# EAGLE board sweef_platine_v5_fertig (EAGLE 9.7.0)
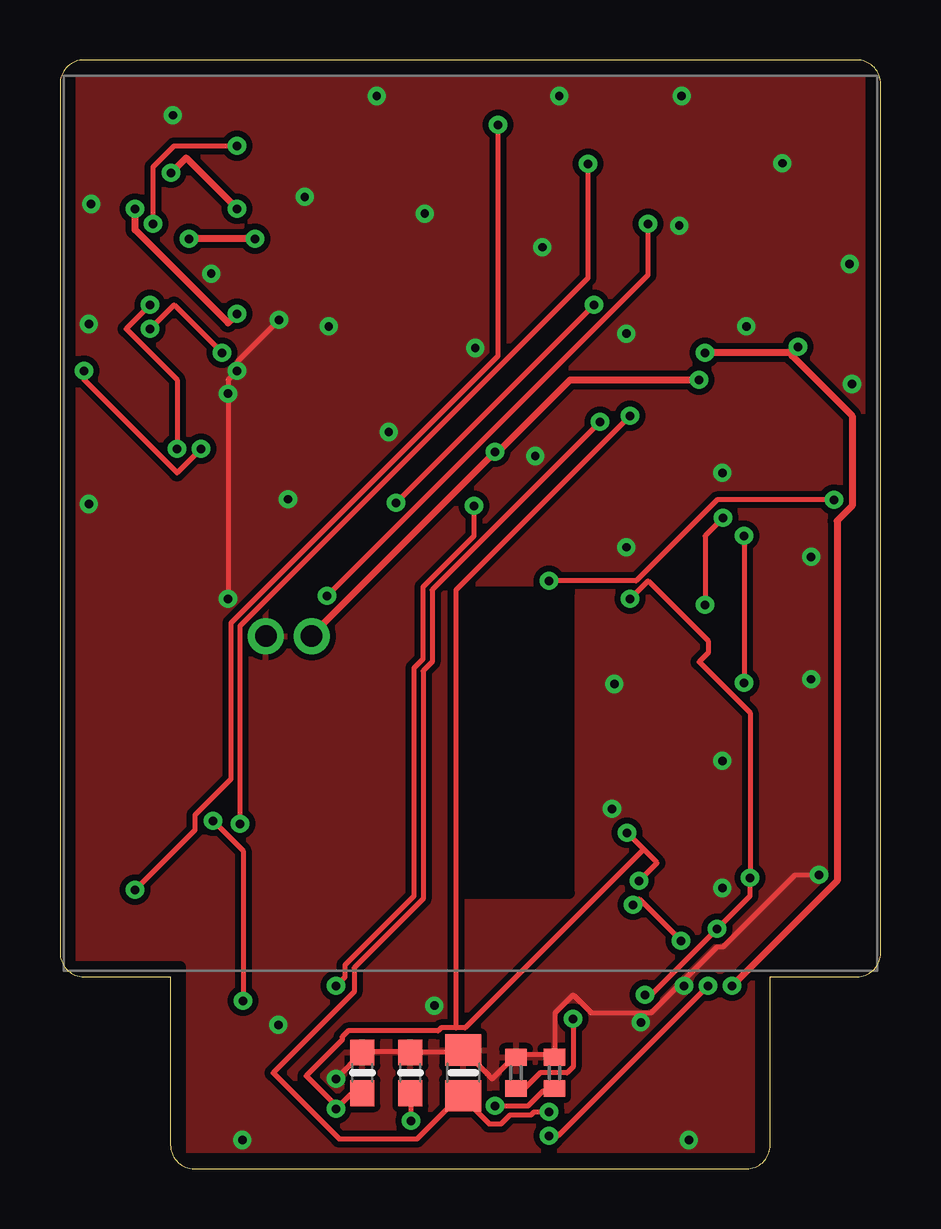
[diagram p0: board, top side]
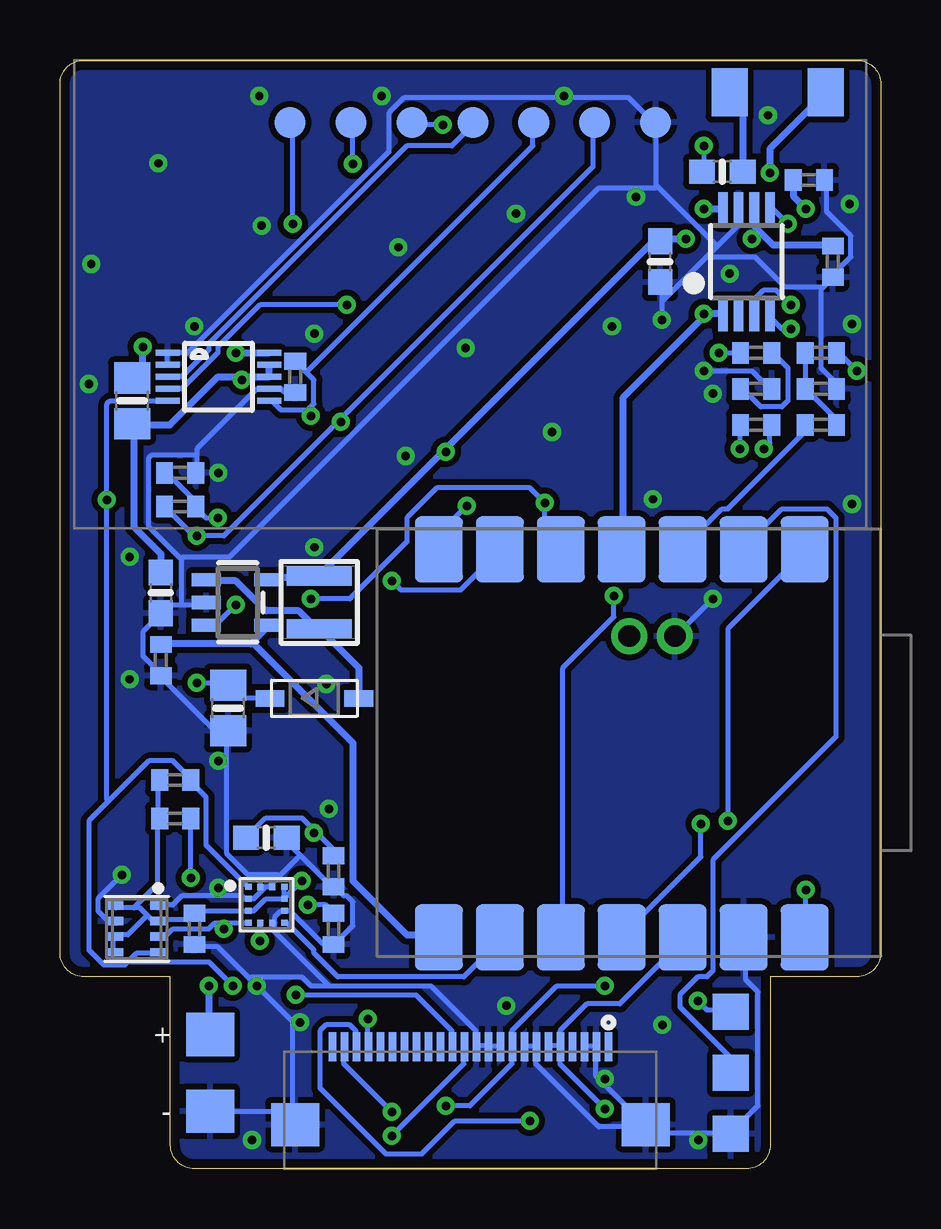
[diagram p1: board, bottom side, seen from below]

Size 34.2 x 46.2 mm. Coordinates in mm from the lower left corner, seen from the top.
Outline: 5.6,0 28.6,0 arc90 29.6,1 29.6,8 33.2,8 arc90 34.2,9 34.2,45.2 arc90 33.2,46.2 1,46.2 arc90 0,45.2 0,9 arc90 1,8 4.6,8 4.6,1 arc90 5.6,0
Copper layers (1*16): Top 0.035mm / dielectric 1.5mm / Bottom 0.035mm
Design rules "Fusion Electronics Design Rules": minimum track width 6mil, minimum drill 0.35mm, track to track 6mil, track to pad 6mil, pad to pad 6mil, via to via 6mil, smd to smd 6mil, copper to edge 0.4mm, drill to drill 6mil, minimum pad ring 10mil, minimum via ring 8mil, stop-mask expansion 4mil, vias tented up to drill 9999mil, thermal gap 10mil
Net classes: 0 default: width 0.2 mm, drill 0.3 mm, clearance 0.15 mm; 1 Strom: width 0.3 mm, drill 0.3 mm, clearance 0.15 mm to class 0, clearance 0.15 mm
tRestrict: area 16.6,11.5 to 21.2,24; area -1,-1 to 5,8.4; area 29.2,-1 to 35.2,8.4; area -3,-3 to 0.4,49.2; area 33.8,-3 to 37.2,49.2; area -3,45.8 to 37.2,49.2; area -3,-3 to 37.2,0.4
vRestrict: area 16.6,11.5 to 21.2,24; area -1,-1 to 5,8.4; area 29.2,-1 to 35.2,8.4; area -3,-3 to 0.4,49.2; area 33.8,-3 to 37.2,49.2; area -3,45.8 to 37.2,49.2; area -3,-3 to 37.2,0.4

## Footprints (pad centres in the part's own frame; a part is rotated, then mirrored left to right if it is on the bottom)
C0402 = smd 0.7 x 0.9: 1 -0.65,0; 2 0.65,0
0603-NO = smd 1.075 x 1: 1 -0.85,0; 2 0.85,0
0805-NO = smd 1.3 x 1.5: 1 -0.95,0; 2 0.95,0
SOD-123 = smd 1.2 x 0.7: A 1.85,0; C -1.85,0
PADS_2_AKKU = smd 2 x 1.8: 1 0,1.6; 2 0,-1.6
FPC-24_XUNPU_FPC-05FB-24PH20 = smd 0.3 x 1.2: 1 -5.75,-1.84; 2 -5.25,-1.84; 3 -4.75,-1.84; 4 -4.25,-1.84; 5 -3.75,-1.84; 6 -3.25,-1.84; 7 -2.75,-1.84; 8 -2.25,-1.84; 9 -1.75,-1.84; 10 -1.25,-1.84; 11 -0.75,-1.84; 12 -0.25,-1.84; 13 0.25,-1.84; 14 0.75,-1.84; 15 1.25,-1.84; 16 1.75,-1.84; 17 2.25,-1.84; 18 2.75,-1.84; 19 3.25,-1.84; 20 3.75,-1.84; 21 4.25,-1.84; 22 4.75,-1.84; 23 5.25,-1.84; 24 5.75,-1.84 | smd 2 x 1.8: MNT1@0 -7.3,1.41; MNT2@0 7.3,1.41
PADS_3_TASTER = smd 1.5 x 1.5: 1 -2.54,0; 2 0,0; 3 2.54,0
PADS_2_LS = smd 1.5 x 2: 1 -2,0; 2 2,0
INDUCTOR_3X3 = smd 2.7 x 0.8: P$1 0,1.1; P$2 0,-1.1
R0402 = smd 0.7 x 0.9: 1 -0.65,0; 2 0.65,0
TP_7 = smd 1.3 x 1.3: 1 -7.62,0; 2 -5.08,0; 3 -2.54,0; 4 0,0; 5 2.54,0; 6 5.08,0; 7 7.62,0
XIAO_NRF52840_SMD = smd 2.75 x 2: 1 -8.055,7.325; 2 -8.055,4.785; 3 -8.055,2.245; 4 -8.055,-0.295; 5 -8.055,-2.835; 6 -8.055,-5.375; 7 -8.055,-7.915; 8 8.11,-7.915; 9 8.11,-5.375; 10 8.11,-2.835; 11 8.11,-0.295; 12 8.11,2.245; 13 8.11,4.785; 14 8.11,7.325 | drill 0.9 pad 1.5: 19 -4.445,0.018; 20 -4.445,1.923
BMX280_COMBO = smd 0.725 x 0.35: 1 0.925,0.975; 2 0.925,0.325; 3 0.925,-0.325; 4 0.925,-0.975; 5 -0.925,-0.975; 6 -0.925,-0.325; 7 -0.925,0.325; 8 -0.925,0.975
MSOP8_0.65MM = smd 0.4 x 1.4: 1 -0.975,-2.2; 2 -0.325,-2.2; 3 0.325,-2.2; 4 0.975,-2.2; 5 0.975,2.2; 6 0.325,2.2; 7 -0.325,2.2; 8 -0.975,2.2
LGA12_2X2MM = smd 0.275 x 0.25: 1 -0.75,0.75; 2 -0.75,0.25; 3 -0.75,-0.25; 4 -0.75,-0.75; 7 0.75,-0.75; 8 0.75,-0.25; 9 0.75,0.25; 10 0.75,0.75 | smd 0.25 x 0.275: 5 -0.25,-0.75; 6 0.25,-0.75; 11 0.25,0.75; 12 -0.25,0.75
MSOP10 = smd 0.25 x 1: 1 -1,-2.113; 2 -0.5,-2.113; 3 0,-2.113; 4 0.5,-2.113; 5 1,-2.113; 6 1,2.113; 7 0.5,2.113; 8 0,2.113; 9 -0.5,2.113; 10 -1,2.113
SOT23-5 = smd 0.55 x 1.2: 1 -0.95,-1.3; 2 0,-1.3; 3 0.95,-1.3; 4 0.95,1.3; 5 -0.95,1.3

## Placement (x,y rotation side)
C10  100 nF  [C0402]  24.4,33 270 bottom
C20  4,7 uF  [0603-NO]  12.6,4 90 top
C21  4,7 uF  [0603-NO]  14.6,4 90 top
C22  4,7 uF 25 V  [0805-NO]  16.8,4 90 top
C23  4,7 uF  [0603-NO]  30,24 270 bottom
C24  4,7 uF 25 V  [0805-NO]  27.2,19.2 270 bottom
C30  100 nF  [C0402]  28.6,10 270 bottom
C31  220 nF  [C0402]  22.8,10 270 bottom
C32  100 nF  [C0402]  22.8,12.4 270 bottom
C33  10 uF  [0603-NO]  25.6,13.8 0 bottom
C40  33 nF  [C0402]  2.5,32.5 0 bottom
C41  1 uF  [C0402]  2.5,34 0 bottom
C42  1 uF  [C0402]  5.2,34 0 bottom
C43  1 uF  [C0402]  2,37.8 270 bottom
C44  10 uF  [0603-NO]  9.2,37.8 270 bottom
D1  B5819W  [SOD-123]  23.6,19.6 0 bottom
J1  Akku  [PADS_2_AKKU]  27.95,4 0 bottom
J2  Display-Stecker  [FPC-24_XUNPU_FPC-05FB-24PH20]  17.1,3.25 180 bottom
J3  Taster extern  [PADS_3_TASTER]  6.25,4 270 bottom
J5  Lautsprecher/Piezo  [PADS_2_LS]  4.3,44.85 0 bottom
L1  10 uH  [INDUCTOR_3X3]  23.4,23.6 0 bottom
R1  2,2 kR  [R0402]  29.4,14.6 0 bottom
R2  2,2 kR  [R0402]  29.4,16.2 0 bottom
R10  0,1 R 1 %  [0805-NO]  31.2,32 270 bottom
R20  910 kR  [R0402]  19,4 90 top
R21  100 kR  [R0402]  20.6,4 90 top
R22  1 MR  [R0402]  29.2,27.6 0 bottom
R23  105 kR  [R0402]  29.2,29 0 bottom
R24  100 kR  [R0402]  30,21.2 270 bottom
R30  1 kR  [R0402]  2.5,31 0 bottom
R31  10 kR  [R0402]  5.2,31 0 bottom
R32  10 kR  [R0402]  5.2,32.5 0 bottom
R33  100 kR  [R0402]  3,41.2 0 bottom
R34  0 R  [0603-NO]  6.6,41.55 0 bottom
TP  Testpunkte  [TP_7]  17,43.6 0 bottom
U1  XIAO nRF52840 Sense  [XIAO_NRF52840_SMD]  10.5,17.75 270 bottom
U2  DPS310  [BMX280_COMBO]  31,10 0 bottom
U3  PAM8302A  [MSOP8_0.65MM]  5.6,37.8 0 bottom
U4  LIS2MDL  [LGA12_2X2MM]  25.6,11 0 bottom
U5  INA226  [MSOP10]  27.6,33 270 bottom
U6  TPS61040  [SOT23-5]  26.8,23.6 270 bottom

## Library data of the parts
C10 C20-C24 C30-C33 C40-C44 D1 J1-J3 J5 L1 R1 R2 R10 R20-R24 R30-R34 TP U1-U6 = sweef

## Nets
+3V3: C10.1 C20.1 C30.1 C32.1 C33.1 J2.5 J2.6 R1.1 R2.1 TP.5 U1.12 U2.2 U2.5 U2.6 U2.8 U4.3 U4.9 U4.10 U5.6
AMP_INM: C42.1 U3.4
AMP_INM_R: C42.2 R32.1
AMP_INP: R31.2 U3.3
AMP_OUTP: R34.1 U3.5
BOOST_EIN [Strom]: R24.1 U1.8 U6.4
BOOST_FB: R22.2 R23.1 U6.3
BOOST_SW [Strom]: D1.A L1.P$2 U6.1
GND: C10.2 C20.2 C21.2 C22.2 C23.2 C24.2 C30.2 C31.2 C32.2 C33.2 C40.2 C43.2 C44.2 J1.2 J2.2 J2.3 J2.7 J2.8 J2.10 J2.11 J2.12 J2.MNT1@0 J2.MNT2@0 J3.3 R20.2 R21.2 R23.2 R24.2 R32.2 R33.2 TP.7 U1.13 U1.20 U2.1 U2.7 U3.7 U4.2 U4.6 U4.8 U4.11 U4.12 U5.1 U5.2 U5.7 U6.2
KOMPASS_C1: C31.1 U4.5
KOMPASS_INT: U1.9 U4.7
LS+ [Strom]: J5.1 R34.2
LS- [Strom]: J5.2 U3.8
OLED_IREF: J2.21 R20.1
OLED_RES: J2.9 R21.1 U1.7
OLED_VCOMH: C21.1 J2.22
SCL: J2.13 R2.2 U1.6 U2.4 U4.1 U5.5
SDA: J2.14 R1.2 U1.5 U2.3 U4.4 U5.4
TASTE1: J3.1 U1.1
TASTE2: J3.2 U1.2
TON: R30.1 U1.3
TON_HP: C41.2 R31.1
TON_TP: C40.1 C41.1 R30.2
TP_5V: TP.3 U1.14
TP_ALERT: TP.4 U5.3
TP_D9: TP.1 U1.10
TP_D10: TP.2 U1.11
VBAT_AKKU [Strom]: J1.1 R10.1 U5.10
VBAT_SYS [Strom]: C23.1 C43.1 C44.1 L1.P$1 R10.2 U1.19 U3.6 U5.8 U5.9 U6.5
VERST_EIN [Strom]: R33.1 U1.4 U3.1
VPP_13V: C22.1 C24.1 D1.C J2.23 R22.1 TP.6

## Tracks (layer width: path | path; a pad name or v marks a point on that pad's centre or on a via)
+3V3  (via drill 0.35)
  Top 0.2: C20.1 12.5,3.12 12.12,3.12 v11.5,2.5 11.5,2.62 10.25,3.88 11.75,5.38 11.75,5.5 12,5.75 15.75,5.75 15.88,5.88 16.5,5.88 | 24.31,13.31 24.88,12.75 v24.12,12 | 24.31,13.31 v23.62,14 | 16.5,5.88 16.88,5.88 24.31,13.31 | v23.75,31.38 16.5,24.12 16.5,5.88
  Bottom 0.2: 23.94,33.19 23.62,32.88 23.62,31.88 23.81,31.69 | 23.94,33.19 C10.1 | 23.81,31.69 23.88,31.62 25,31.62 25.38,32 U5.6 | 23.94,33.19 14.5,42.62 14.5,43.5 TP.5 | v11.5,2.5 13.38,4.38 13.38,5 J2.5 13.38,5.12 | 13.38,5.12 13.75,5.12 J2.6 | 13.38,5.12 13.38,5.75 12.25,6.88 10.88,6.88 8.38,9.38 8.38,9.62 U1.12 | 23.56,14.06 24.12,14.62 25.62,14.62 C33.1 | 23.56,14.06 22.88,13.38 22.88,13.12 C32.1 | R2.1 30.12,16.12 30.12,14.62 R1.1 30.12,14.5 30.12,11.88 31.12,10.88 | U2.5 32,9.12 32,9.62 U2.6 31.88,9.75 31.38,9.75 30.56,10.56 | 24.88,11.25 24.88,11.75 U4.10 | 24.88,11.25 25.62,11.25 26.12,10.75 U4.3 28.5,10.75 C30.1 28.88,10.38 30,10.38 U2.2 30.12,10.38 30.38,10.38 30.56,10.56 | 31.12,10.88 30.88,10.88 30.56,10.56 | 31.12,10.88 31.88,10.88 U2.8 | 24.88,11.25 v24.12,12 | v23.62,14 23.56,14.06 | 24.88,11.25 U4.9 | v23.75,31.38 23.75,31.62 23.81,31.69
AMP_INM  (via drill 0.35)
  Top 0.2: v6.75,34 4.75,36 v3.75,35
  Bottom 0.2: v6.75,34 C42.1 | v3.75,35 4.12,35 4.62,35.5 U3.4
AMP_INM_R
  Bottom 0.2: R32.1 5.75,32.5 5,31.75 4.12,31.75 3.88,32 3.88,33.38 4.5,34 C42.2
AMP_INP  (via drill 0.35)
  Top 0.2: v4.88,30 4.88,32.88 2.75,35 v3.75,36
  Bottom 0.2: v4.88,30 4.62,30.25 4.62,31 R31.2 | v3.75,36 4.38,36.62 4.88,36.62 5.25,36.25 5.25,35.62 U3.3
AMP_OUTP  (via drill 0.35)
  Top 0.2: v7.38,42.62 4.75,42.62 3.88,41.75 v3.88,39.38
  Bottom 0.2: v7.38,42.62 7.38,41.62 R34.1 | v3.88,39.38 4.5,40 U3.5
BOOST_EIN
  Bottom 0.3: 26.25,21.88 30,21.88 R24.1 | 26.25,21.88 25.5,22.62 U6.4 | U1.8 18.5,9.75 19.75,9.75 22,12 22,17.75 26.12,21.88 26.25,21.88
BOOST_FB  (via drill 0.35)
  Top 0.2: v26.88,23.5 26.88,26.38 v27.62,27.12
  Bottom 0.2: R23.1 29.75,29 28.62,27.88 28.62,27.62 R22.2 28.5,27.5 28.12,27.12 v27.62,27.12 | v26.88,23.5 27.62,22.75 28,22.75 U6.3
BOOST_SW
  Bottom 0.3: D1.A 21.75,20.88 23.38,22.5 L1.P$2 23.5,22.5 24.25,23.25 25.62,23.25 26.88,24.5 28,24.5 U6.1
GND  (via drill 0.35)
  Top 0.2: v9.12,35.38 7.38,33.62 v7.38,33.25 7,32.88 v7,23.75 | v31.62,12.25 30.62,12.25 27.62,9.25 27.38,9.25 25.94,7.81 | 25.94,7.81 24.62,6.5 22.12,6.5 21.38,7.25 20.62,6.5 20.62,4.75 R21.2 20.5,4.75 19,4.75 | 19,4.75 18,3.75 C22.2 16.75,4.88 14.62,4.88 C21.2 14.5,4.88 12.62,4.88 C20.2 v11.5,3.75 | 19,4.75 R20.2 | v26,7.62 26,7.75 25.94,7.81
  Bottom 0.2: 2.44,36.69 2,37.12 C43.2 2,37.25 1.25,38 1.25,38.88 2.25,39.88 2.25,41.12 R33.2 | 2.44,36.69 2.5,36.62 2.5,33.38 1.88,32.75 1.88,32.5 C40.2 | v7.38,33.25 5.38,33.25 4.62,32.5 R32.2 | 9.12,36.12 9.12,36.88 C44.2 | 9.12,36.12 v9.12,35.38 | 9.12,36.12 7.19,38.06 | 7.19,38.06 6.81,38.44 | 6.81,38.44 6,39.25 6,40 U3.7 | v7,23.75 8.5,22.25 U1.20 | 2.44,36.69 2.5,36.75 4,36.75 5.25,38 7.12,38 7.19,38.06 | U5.2 29.75,33.5 29.75,34 U5.1 28.88,34 20.5,42.38 20.5,44 19.88,44.62 10.5,44.62 9.5,43.62 TP.7 9.38,43.5 9.38,41 9.31,40.94 | 9.31,40.94 6.81,38.44 | J2.8 14.75,5.12 14.38,5.12 J2.7 14.38,5 14.38,4.38 11.75,1.75 9.88,1.75 J2.MNT1@0 | J2.3 12.25,5.12 11.88,5.12 J2.2 11.88,5 11.88,3.88 11.56,3.56 | 11.56,3.56 9.88,1.88 J2.MNT1@0 | 6.25,1.5 9.5,1.5 9.75,1.75 J2.MNT1@0 | 6.25,1.5 5.12,2.62 5.12,7.38 5.62,7.88 5.62,9.62 U1.13 | 6.25,1.5 J3.3 | v31.62,12.25 32.62,11.25 32.62,10.75 32.25,10.38 32,10.38 U2.7 | v11.5,3.75 11.5,3.62 11.56,3.56 | C10.2 24.5,32.38 24.88,32.38 25,32.5 U5.7 26,32.5 28.5,30 28.5,29.75 | 28.5,29.75 28.5,29 R23.2 | 29.12,23.5 29.75,23.5 30,23.25 C23.2 30,23.12 30.75,22.38 30.75,21.38 30,20.62 R24.2 30,20.5 27.75,18.25 27.25,18.25 | 29.12,23.5 28.12,23.5 U6.2 | 28.5,29.75 30.38,29.75 30.5,29.62 30.5,26.75 29.19,25.44 | 29.19,25.44 29.12,25.38 29.12,23.5 | 24.19,13.06 24.75,13.62 C33.2 | 24.19,13.06 22.88,11.75 C32.2 22.75,11.75 22.38,11.38 22.25,11.38 22,11.12 22,10.12 22.75,9.38 C31.2 22.88,9.38 23.25,9.38 24.62,10.75 U4.8 25,10.75 25.25,10.5 25.25,10.25 | U4.12 25.62,11.75 | 25.62,11.75 25.5,11.75 | 25.5,11.75 U4.11 | 25.62,11.75 26.12,11.25 U4.2 26.5,11.25 26.62,11.38 29.12,11.38 29.5,11 30,11 U2.1
  Bottom 0.2: 25.5,11.75 25.06,12.19 | 25.06,12.19 24.19,13.06 | J2.10 15.88,5.12 16.25,5.12 J2.11 16.38,5.12 16.75,5.12 J2.12 16.88,5.12 16.88,5.75 18.75,7.62 23,7.62 | 26.31,7.94 v26,7.62 24.5,6.12 24.5,2.38 | 26.31,7.94 27.62,9.25 28.5,9.25 C30.2 | 24.5,2.38 24.5,1.88 J2.MNT2@0 24.5,2.38 | 23,7.62 23.75,7.62 24.12,8 26.25,8 26.31,7.94 | 25.25,10.25 25.25,9.88 23,7.62 | 25.25,10.25 U4.6 | 24.5,2.38 27.88,2.38 J1.2 | 27.25,18.25 27.25,13.12 26.38,12.25 25.12,12.25 25.06,12.19 | 27.25,18.25 C24.2 | 9.31,40.94 9.38,40.88 11.75,40.88 27.12,25.5 29.12,25.5 29.19,25.44
  other vias: 7.6,1.2 26.2,1.2 9.1,6 24.2,6.1 15.6,6.8 27.6,11.7 23,15 27.6,17 23.1,20.2 31.3,20.4 31.3,25.5 23.6,25.9 1.2,27.7 9.5,27.9 27.6,29 19.8,29.7 13.7,30.7 7,32.3 33,32.7 17.3,34.2 23.6,34.8 11.2,35.1 28.6,35.1 1.2,35.2 6.3,37.3 32.9,37.7 20.1,38.4 25.8,39.3 15.2,39.8 1.3,40.2 10.2,40.5 30.1,41.9 4.7,43.9 13.2,44.7 20.8,44.7 25.9,44.7
  pour Top (isolate 0.25): 5,0.4 29.2,0.4 29.2,8.4 33.8,8.4 33.8,45.8 0.4,45.8 0.4,8.4 5,8.4
  pour Bottom (isolate 0.25): 5,0.4 29.2,0.4 29.2,8.4 33.8,8.4 33.8,45.8 0.4,45.8 0.4,8.4 5,8.4
KOMPASS_C1  (via drill 0.35)
  Top 0.2: v25.88,9.5 24.12,11.25 v23.88,11
  Bottom 0.2: v25.88,9.5 25.88,10.25 U4.5 | v23.88,11 23.12,11 22.88,10.75 C31.1
KOMPASS_INT
  Bottom 0.2: U1.9 15.88,9.5 17.38,8 22.62,8 23.62,9 23.62,9.12 24.75,10.25 U4.7
LS+
  Bottom 0.3: R34.2 5.75,44.25 6.25,44.75 J5.1
LS-  (via drill 0.35)
  Top 0.3: v7.38,40 5.25,42.12 v4.62,41.5
  Bottom 0.3: v7.38,40 U3.8 | v4.62,41.5 4.62,42.5 2.38,44.75 J5.2
OLED_IREF  (via drill 0.35)
  Top 0.2: v21.38,6.25 21.38,4.25 21.12,4 20,4 19.38,3.38 19,3.38 R20.1
  Bottom 0.2: v21.38,6.25 21.38,5.12 J2.21
OLED_RES  (via drill 0.35)
  Top 0.2: v18.12,2.62 19.5,2.62 20.12,3.25 20.5,3.25 R21.1 | v17.25,27.62 17.25,26.38 15.12,24.25 15.12,21.25 14.75,20.88 14.75,11.38 11.88,8.5 11.88,8 v11.5,7.62
  Bottom 0.2: v18.12,2.62 17.12,2.62 15.38,4.38 15.38,5 J2.9 15.38,5.12 15.38,5.75 13.5,7.62 v11.5,7.62 | v17.25,27.62 18.38,26.5 18.38,25.88 U1.7
OLED_VCOMH  (via drill 0.35)
  Top 0.2: v14.62,2 14.62,3.12 C21.1
  Bottom 0.2: v14.62,2 17.75,2 19.12,0.62 20.62,0.62 23.38,3.38 23.38,5.75 23.12,6 22.12,6 21.88,5.75 21.88,5.12 J2.22
SCL  (via drill 0.35)
  Top 0.2: v20.38,1.38 20.75,1.38 v27,7.62 | v20.38,24.5 24,24.5 27.38,27.88 v32.25,27.88
  Bottom 0.2: U4.1 26.38,11.75 28.12,13.5 28.12,15.5 28.75,16.12 R2.2 28.75,16.25 29.5,17 30.5,17 32.19,15.31 | 31.31,8.69 31.5,8.5 32.38,8.5 33,9.12 33,14.5 32.19,15.31 | 31.31,8.69 31,9 30.12,9 U2.4 | U5.5 32.12,32 32.25,31.88 v32.25,27.88 32.25,15.38 32.19,15.31 | v20.38,1.38 17.38,4.38 17.38,5 J2.13 | v27,7.62 28,8.62 31.25,8.62 31.31,8.69 | v20.38,24.5 20,24.12 17.5,24.12 15.88,25.75 U1.6
SDA  (via drill 0.35)
  Top 0.2: v24.38,7.25 24.62,7.25 v27.38,10 28.75,11.38 v28.75,12.12 28.75,19 26.62,21.12 27,21.5 27,22 24.5,24.5 v23.75,23.75 | v14,27.75 v22.25,36
  Bottom 0.2: 27.38,10.25 27.75,10.25 28,10 29.5,10 29.75,9.75 30,9.75 U2.3 | 27.38,10.25 U4.4 | v28.75,12.12 R1.2 | 27.38,10.25 v27.38,10 | v24.38,7.25 19.38,7.25 17.88,5.75 17.88,5.12 J2.14 | U5.4 29.12,32.5 27.62,34 27.62,34.25 25.88,36 v22.25,36 | U1.5 13.38,25.88 14,26.5 v14,27.75 14.62,28.38 18.5,28.38 19.75,27.12 19.75,26.12 22.12,23.75 v23.75,23.75
TASTE1  (via drill 0.35)
  Top 0.2: v7.62,7 7.62,13.25 v6.38,14.5
  Bottom 0.2: v7.62,7 7.25,6.62 6.25,6.62 J3.1 | v6.38,14.5 6.38,22.5 3.12,25.75 U1.1
TASTE2
  Bottom 0.2: J3.2 6.25,4.62 8.38,6.75 8.38,7.25 7.62,8 7.25,8 7,8.25 7,12.88 1.88,18 1.88,27.12 2.25,27.5 4.12,27.5 5.75,25.88 U1.2
TON
  Bottom 0.2: R30.1 3.25,31 3.25,30.62 6.38,27.5 6.62,27.5 8.25,25.88 U1.3
TON_HP  (via drill 0.35)
  Top 0.2: v1,33.25 1,32.88 4.88,29 v5.88,30
  Bottom 0.2: v1,33.25 1.75,34 C41.2 | v5.88,30 5.88,31 R31.1
TON_TP
  Bottom 0.2: 3.12,32.5 1.88,31.25 1.88,31 R30.2 | 3.12,32.5 3.12,34 C41.1 | 3.12,32.5 C40.1
TP_5V  (via drill 0.35)
  Top 0.2: v18.25,43.5 18.25,33.88 7.12,22.75 7.12,16.25 5.62,14.75 5.62,14.12 v3.12,11.62
  Bottom 0.2: v18.25,43.5 19.5,43.5 TP.3 | v3.12,11.62 3.12,9.75 U1.14
TP_ALERT
  Bottom 0.2: U5.3 29.12,33 28,34.12 28,34.38 19.75,42.62 17.88,42.62 17,43.5 TP.4
TP_D9  (via drill 0.35)
  Top 0.2: v24.5,39.38 24.5,37.25 v11.12,23.88
  Bottom 0.2: v24.5,39.38 24.5,43.5 TP.1 | v11.12,23.88 11.12,23 13.25,20.88 13.25,9.75 U1.10
TP_D10  (via drill 0.35)
  Top 0.2: v22,41.88 22,37.12 7.5,22.62 v7.5,14.38
  Bottom 0.2: v22,41.88 22,43.5 TP.2 | v7.5,14.38 7.5,13 10.75,9.75 U1.11
VBAT_AKKU  (via drill 0.35)
  Top 0.3: 30.5,34 v26.88,34 | v30.75,34.25 30.5,34 | v28,7.62 32.38,12 32.38,27 33,27.62 33,31.38 30.5,33.88 30.5,34
  Bottom 0.3: v26.88,34 U5.10 | v30.75,34.25 30.75,33.38 31.12,33 R10.1 | v28,7.62 28,5.62 J1.1
VBAT_SYS  (via drill 0.35)
  Top 0.3: v8.12,38.75 v5.38,38.75 | U1.19 10.5,22.25 v18.12,29.88 18.25,29.88 21.25,32.88 v26.62,32.88
  Bottom 0.3: U5.9 U5.8 26.62,33 | C23.1 30,25.62 31.12,26.75 31.12,31 R10.2 31,31 29.62,31 27.62,33 26.62,33 | 5.06,39.06 5.25,39.25 5.25,40 U3.6 | 5.06,39.06 4.5,38.5 2,38.5 C43.1 | 18.19,29.94 23.38,24.75 L1.P$1 23.5,24.62 25.38,24.62 U6.5 | 18.19,29.94 9.5,38.62 9.25,38.62 C44.1 9.12,38.75 v8.12,38.75 | v5.38,38.75 5.06,39.06 | v18.12,29.88 18.19,29.94 | v26.62,32.88 26.62,33
VERST_EIN  (via drill 0.35)
  Top 0.3: v3.12,40 3.12,39.12 7,35.25 v7.38,35.62
  Bottom 0.3: v3.12,40 3.62,40.5 3.62,41.12 R33.1 | U3.1 6.62,35.62 v7.38,35.62 7.38,35.5 10.75,32.12 10.75,25.88 U1.4
VPP_13V  (via drill 0.35)
  Top 0.2: v20.38,2.38 19.75,2.38 19.62,2.25 18.75,2.25 18.38,1.88 17.88,1.88 16.75,3 C22.1 16.75,2.88 16.5,2.88 14.88,1.25 11.62,1.25 8.88,4 12.25,7.38 12.25,8.38 15.12,11.25 15.12,20.75 15.5,21.12 15.5,24.12 v22.5,31.12 | v28.5,26.38 v28.5,20.25
  Bottom 0.2: v20.38,2.38 22.38,4.38 22.38,5 J2.23 | D1.C 25.5,19.62 26.62,19.62 27.12,20.12 C24.1 27.25,20.25 v28.5,20.25 | R22.1 28.62,26.38 v28.5,26.38 27.38,26.38 22.56,31.19 | 22.56,31.19 12,41.75 12,43.5 TP.6 | v22.5,31.12 22.56,31.19

## Text on the board
tDocu: Displayglas vorne 33,9 x 37,3 (Flachbandkabel unten) | Sweef v5
bDocu: Akku 300 mAh hinten 33 x 19,5 x 6 (auf 1,5 mm Schaumstoff, darunter nur flache Teile)